# Altium PCB Karta_TETRA.PCBDOC (part 7 of 8)
Units mm, origin at the board's own origin, x right, y up, seen from the top; angles counter-clockwise.
Board outline 70 x 83.2 mm, 6 copper layers (TopLayer, Layer 1, Layer 2, Layer 3, Layer 4, Bottom Layer), stack 0.914 mm thick; 344 components, 222 nets, 1133 pads, 615 vias.
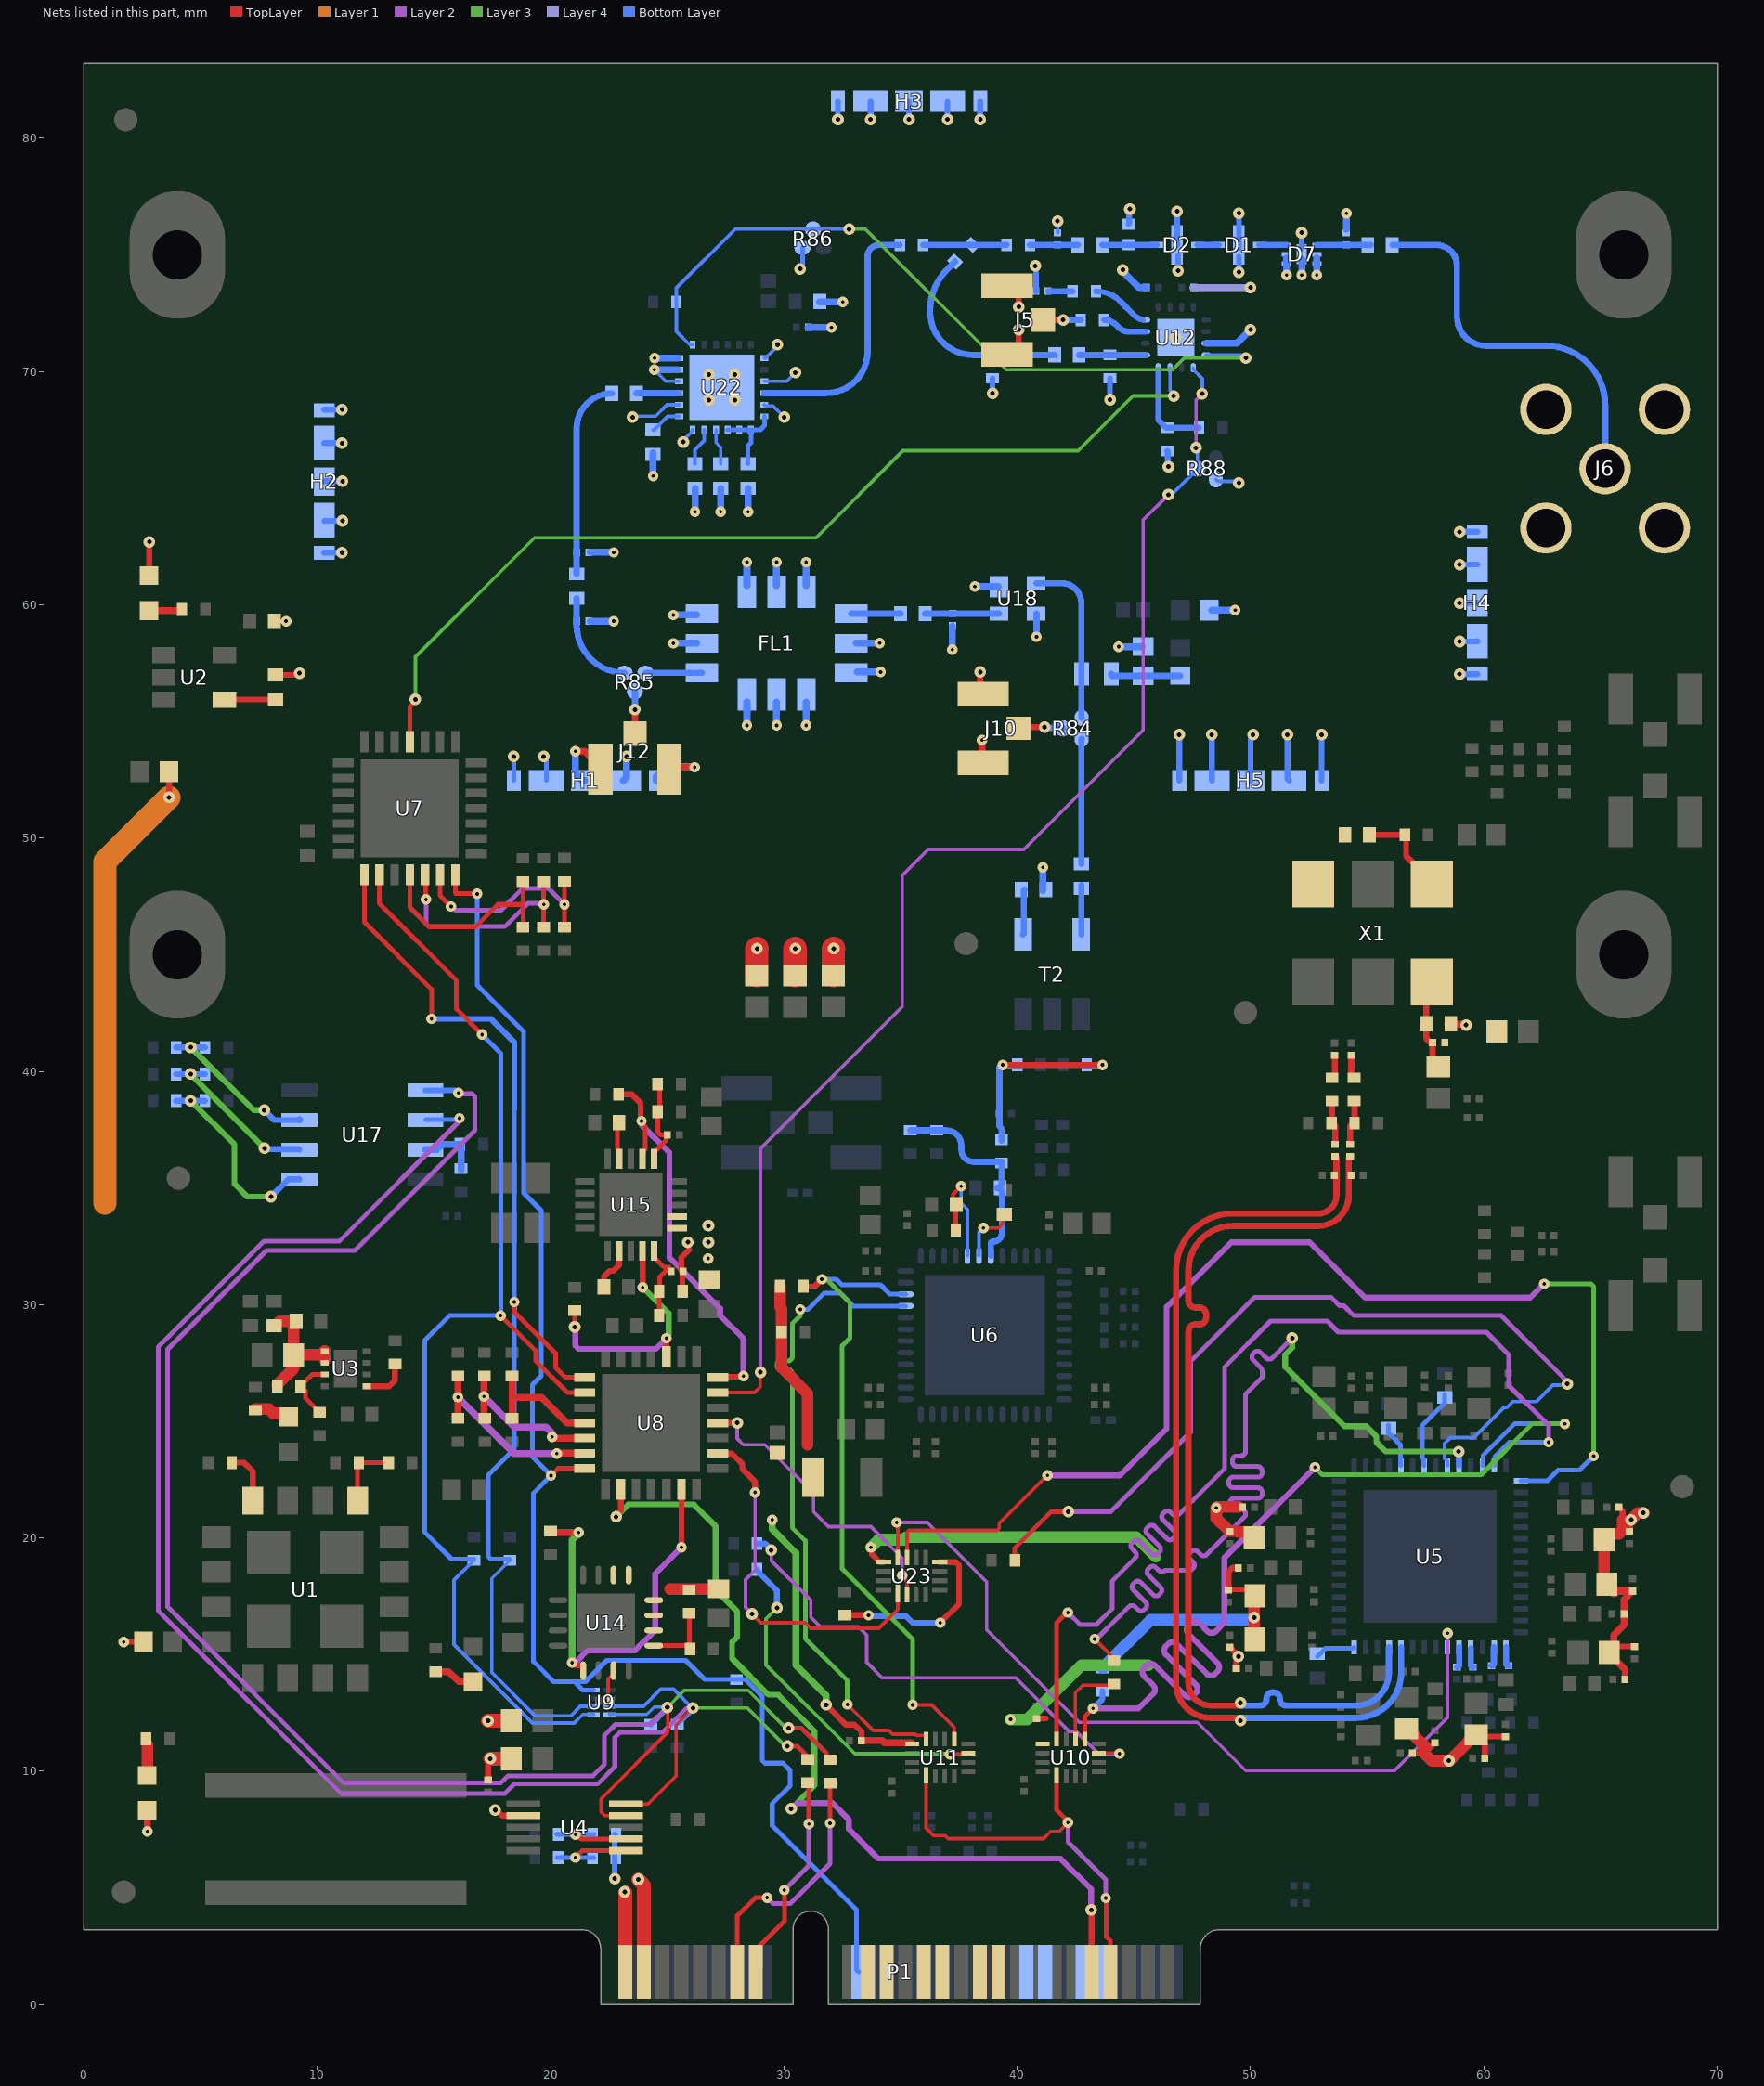
[diagram p8: the nets of this part, all layers, seen from the top]

## Via types
v1: diameter 0.5, hole 0.2, TopLayer to Bottom Layer, tented both sides, 402 vias
v2: diameter 0.45, hole 0.15, TopLayer to Bottom Layer, tented both sides, 189 vias
v3: diameter 0.45, hole 0.15, TopLayer to Bottom Layer, 23 vias
v4: diameter 0.5, hole 0.2, TopLayer to Bottom Layer, 1 vias

## Nets (pads, with @x,y where several pads share a name; then routed paths per layer and width w, separated by ;. In a path a pad name is that pad's centre, name@x,y a point inside that pad or via, vN(x,y) a via of type N, cw(c..) or ccw(c..) an arc to the next point about the centre after c; other vN are vias at no path point) (continued)
GND_ATT: C4.1 C5.1 C11.2 C12.1 C13.1 C48.1 C49.2 C158.1 C161.2 C162.2 C168.2 C180.1 C181.1 C182.2 C183.2 C184.2 C185.2 C186.1 C187.1 D1.2 D2.2 D7.2 D7.3 D7.4 D7.5 D7.7 D10.2 FB32.2 FB33.2 FB34.2 FL1.1 FL1.2 FL1.3 FL1.5 FL1.6 FL1.7 FL1.8 FL1.9 FL1.11 FL1.12 H1.1 H2.1 H3.1 H4.1 H5.1 J5.1 J5.3 J6.MH J10.1 J10.3 J12.1 J12.3 L1.1 R47.1 R48.2 R78.2 R86.2 R88.2 U12.11 U12.17 U18.2 U18.4 U22.1 U22.3 U22.5 U22.12 U22.14 U22.16 U22.17 U22.18 U22.25 | length 96.1
  TopLayer w0.2: C4.1@8.082,59.297 v2(8.662,59.297)
  TopLayer w0.25: D10.2@2.789,61.25 2.8,61.261 v1(2.8,62.7) ; C5.1@8.206,56.993 9.091,56.993 9.169,57.071 v1(9.237,57.071) ; J10.3@38.415,56.473 v1(38.415,57.117) ; J5.1@40.068,71.145 v1(40.068,71.788) ; v1(40.068,72.769) J5.3@40.068,73.412
  TopLayer w0.3: v2(21.059,53.722) 21.458,53.722 J12.3@22.144,53.037 ; J12.1@25.18,53.037 v2(26.178,53.037) ; J10.1@38.494,53.202 v2(38.494,54.2)
  TopLayer w1: FB34.2@28.836,44.095 28.836,45.248 v1(28.85,45.263) ; FB33.2@30.476,44.095 30.476,45.25 v1(30.488,45.263) ; FB32.2@32.114,44.102 32.114,45.239 v1(32.137,45.263)
  Layer 4 w0.3: 47.53,73.6 v1(50,73.6)
  Bottom Layer w0.15: v1(23.517,68.043) 23.562,68.088 24.506,68.088 24.993,68.574 U22.14@25.514,68.574 ; v2(24.443,70.074) 24.943,69.574 U22.16@25.514,69.574 ; v1(25.689,66.974) 25.689,67.049 26.089,67.449 U22.12@26.089,67.499 ; U22.5@29.164,68.574 29.214,68.524 29.535,68.524 v1(30.016,68.043) ; U22.3@29.164,69.574 30.115,69.574 v1(30.49,69.949) ; U22.1@29.164,70.574 29.214,70.574 29.719,71.08 v1(29.719,71.149) ; C187.1@41.733,75.946 v1(41.733,76.445) ; R88.2@48.516,65.381 48.604,65.293 49.432,65.293 v1(49.499,65.226)
  Bottom Layer w0.2: v1(18.421,53.5) 18.421,52.474 H1.1@18.423,52.472 ; v1(19.707,53.5) 19.707,53.419 19.823,53.302 H1.1@19.823,52.472 ; v1(30.7,74.4) 30.7,74.481 30.8,74.581 R86.2@30.8,75.3 ; C162.2@45.404,58.202 C162.2@45.409,58.208
  Bottom Layer w0.25: H2.1@10.299,62.23 10.301,62.233 11.058,62.233 v1(11.061,62.236) ; H2.1@10.299,66.924 10.301,66.927 11.058,66.927 v1(11.061,66.93) ; H2.1@10.299,68.364 10.301,68.367 11.058,68.367 v1(11.061,68.37) ; H2.1@10.313,63.593 10.316,63.596 11.073,63.596 v1(11.076,63.599) ; H2.1@10.313,65.293 10.316,65.296 11.073,65.296 v1(11.076,65.299) ; H3.1@32.309,81.57 32.312,81.567 32.312,80.81 v1(32.315,80.808) ; H3.1@33.709,81.57 33.712,81.567 33.712,80.81 v1(33.715,80.808) ; H3.1@35.359,81.57 35.362,81.567 35.362,80.81 v1(35.365,80.808) ; H3.1@37.009,81.57 37.012,81.567 37.012,80.81 v1(37.015,80.808) ; H3.1@38.409,81.57 38.412,81.567 38.412,80.81 v1(38.415,80.808) ; v1(38.943,69.063) R47.1@38.943,69.707 ; v1(40.775,74.525) cw(c40.697,74.447) 40.807,74.447 C13.1@40.807,73.44 ; v1(43.977,68.792) R48.2@43.977,69.707 ; L1.1@44.771,76.318 44.8,76.346 44.8,76.932 v1(44.829,76.961) ; R78.2@46.43,66.593 46.455,66.568 46.455,65.95 v1(46.481,65.925) ; D2.2@46.854,75.394 v1(46.854,76.866) ; v1(46.897,74.322) D2.2@46.897,74.965 ; v1(46.944,54.434) 46.947,54.431 46.947,52.474 H5.1@46.951,52.471 ; v1(48.339,54.434) 48.339,52.483 H5.1@48.351,52.471 ; v1(49.504,74.262) D1.2@49.504,74.905 ; D1.2@49.504,75.311 v1(49.504,76.783) ; H5.1@50,52.472 50.001,54.258 50.11,54.367 v1(50.11,54.434) ; v1(51.584,54.434) 51.584,52.538 H5.1@51.65,52.472 ; D7.7@52.193,75.303 v1(52.193,75.946) ; v1(53.048,54.434) 53.049,54.433 53.049,52.472 H5.1@53.05,52.472 ; v1(58.961,57.026) 58.964,57.029 59.721,57.029 H4.1@59.722,57.03 ; v1(58.961,58.426) 58.964,58.429 59.721,58.429 H4.1@59.724,58.432 ; v1(58.961,60.076) 58.964,60.079 59.721,60.079 H4.1@59.722,60.08 ; v1(58.961,61.726) 58.964,61.729 59.721,61.729 H4.1@59.724,61.732 ; v1(58.961,63.126) 58.964,63.129 59.721,63.129 H4.1@59.724,63.132
  Bottom Layer w0.268: v2(40.827,58.621) U18.4@40.827,59.619
  Bottom Layer w0.3: v2(21.059,53.722) 21.059,52.772 21.359,52.472 H1.1@21.473,52.472 ; C48.1@21.704,59.297 v2(22.702,59.297) ; C168.2@21.704,62.247 v2(22.702,62.247) ; H1.1@23.123,52.472 23.253,52.602 v1(23.253,53.5) ; v2(24.393,65.518) C182.2@24.393,66.516 ; v2(24.443,70.074) U22.17@25.441,70.074 ; v2(24.456,70.574) U22.18@25.454,70.574 ; H1.1@24.523,52.472 24.523,52.622 24.673,52.772 24.823,52.772 25.088,53.037 v2(26.178,53.037) ; v2(25.263,58.35) FL1.11@26.26,58.35 ; v2(25.263,59.563) FL1.12@26.26,59.563 ; v2(26.189,63.983) C183.2@26.189,64.981 ; v2(27.294,63.983) C184.2@27.294,64.981 ; v2(28.415,54.829) FL1.9@28.415,55.826 ; FL1.1@28.415,60.827 v2(28.415,61.825) ; v2(28.464,63.983) C185.2@28.464,64.981 ; v2(29.685,54.829) FL1.8@29.685,55.826 ; FL1.2@29.685,60.827 v2(29.685,61.825) ; v2(30.955,54.829) FL1.7@30.955,55.826 ; FL1.3@30.955,60.827 v2(30.955,61.825) ; C180.1@31.036,71.887 v2(32.034,71.887) ; C181.1@31.522,72.981 v2(32.52,72.981) ; FL1.5@33.111,58.352 v2(34.109,58.352) ; FL1.6@33.146,57.117 v2(34.143,57.117) ; v2(37.221,58.079) C49.2@37.221,59.077 ; v2(38.181,60.782) U18.2@39.179,60.782 ; C158.1@41.097,47.745 v2(41.097,48.743) ; v2(44.348,58.202) C162.2@45.346,58.202 ; v1(44.524,74.36) 44.562,74.322 44.562,74.262 45.224,73.6 C12.1@45.527,73.6 ; C11.2@47.567,73.6 v1(50,73.6) ; U12.11@48.097,71.207 49.419,71.207 v1(50,71.788) ; C161.2@48.345,59.768 v2(49.343,59.768) ; v2(51.543,74.131) D7.4@51.543,74.626 51.543,74.878 ; v2(52.193,74.131) D7.7@52.193,74.817 ; v2(52.843,74.131) D7.3@52.843,74.626 52.843,74.878 ; 54.108,76.097 v2(54.108,76.783)
  other v1: 26.789,68.774 27.889,68.774 26.789,69.874 27.889,69.874 46.797,71.457
GND_VCXO: C42.1 C111.1 C112.1 FB15.1 X1.3 | length 0.8
  TopLayer w0.3: C112.1@58.453,42.044 58.483,42.014 59.214,42.014 v1(59.244,41.984)
I2C_SCL: R66.1 R71.2 U4.5 U9.3 U17.6 | length 75.3
  TopLayer w0.15: U4.5@23.227,8.594 24.173,8.594 25.379,9.8 25.379,11.99 v1(26.099,12.711)
  TopLayer w0.2: v1(30.156,11.077) 30.568,11.077 31.025,10.62 R71.2@31.025,10.454
  Layer 2 w0.2: v2(16.101,37.991) 16.101,37.871 10.953,32.724 7.725,32.724 3.181,28.18 3.181,16.885 11.017,9.049 18.041,9.049 18.447,9.456 22.017,9.456 22.754,10.193 22.754,11.446 22.968,11.66 24.79,11.66 25.842,12.711 v1(26.099,12.711)
  Layer 3 w0.15: v1(26.099,12.711) 28.429,12.711 30.064,11.077 v1(30.156,11.077)
  Bottom Layer w0.15: U9.3@22.514,12.781 23.988,12.781 24.72,13.514 25.265,13.514 26.069,12.711 v1(26.099,12.711)
  Bottom Layer w0.2: U17.6@14.654,37.931 16.101,37.931 v2(16.101,37.991) ; R66.1@25.429,12.019 25.629,12.219 25.679,12.219 26.069,12.609 v1@26.069,12.711
I2C_SDA: R65.1 R70.2 U4.4 U9.4 U17.5 | length 77.5
  TopLayer w0.15: U4.4@23.227,8.094 22.327,8.094 22.167,8.254 22.167,8.815 25.019,11.666 25.019,12.719 v1(25.003,12.735)
  TopLayer w0.2: v1(30.2,11.851) 30.753,11.851 31.807,10.797 31.807,10.616 R70.2@31.982,10.441
  Layer 2 w0.2: v2(16.054,39.074) 16.092,39.036 16.643,39.036 16.76,38.919 16.76,37.474 11.61,32.324 7.82,32.324 3.581,28.085 3.581,17.05 11.141,9.491 17.861,9.491 18.175,9.806 21.823,9.806 22.313,10.295 22.313,11.539 22.783,12.01 24.256,12.01 24.982,12.735 v1(25.003,12.735)
  Layer 3 w0.15: v1(25.003,12.735) 25.734,13.466 28.466,13.466 30.081,11.851 v1(30.2,11.851)
  Bottom Layer w0.15: U9.4@22.514,12.431 24.126,12.431 24.445,12.751 v1@25.019,12.751
  Bottom Layer w0.2: R65.1@24.3,11.969 25.003,12.673 v1(25.003,12.735)
  Bottom Layer w0.25: U17.5@14.637,39.184 15.89,39.184 15.999,39.074 v2(16.054,39.074)
LMK_CLKin0_N: C46.1 U5.33 | length 0.9
  Bottom Layer w0.267: C46.1@58.847,14.465 ccw(c58.847,14.56) 58.943,14.56 U5.33@58.943,15.306
LMK_CLKin0_P: C47.1 U5.32 | length 0.8
  Bottom Layer w0.267: U5.32@59.443,15.247 59.443,14.56 ccw(c59.538,14.56) C47.1@59.538,14.465
LMK_CLKin1_N: C59.1 U5.30 | length 0.8
  Bottom Layer w0.268: C59.1@60.323,14.519 ccw(c60.323,14.625) 60.429,14.625 U5.30@60.429,15.306
LMK_CLKin1_P: C54.1 U5.29 | length 0.8
  Bottom Layer w0.268: U5.29@60.957,15.306 60.957,14.625 ccw(c61.063,14.625) C54.1@61.063,14.519
LMK_CLKsel: U5.34 U23.12 | length 35.9
  TopLayer w0.15: v2(34.831,20.66) 34.877,20.615 U23.12@34.877,19.164
  Layer 2 w0.15: v2(34.831,20.66) 36.144,20.66 38.693,18.111 38.693,16.069 42.663,12.099 47.725,12.099 49.796,10.028 56.173,10.028 58.448,12.303 v2(58.448,15.913)
  Bottom Layer w0.15: U5.34@58.443,15.306 58.429,15.32 58.429,15.893 v2(58.448,15.913)
LMK_CLKsel_3V3: U8.23 U23.1 | length 15.7
  TopLayer w0.15: v1(28.635,16.742) 29.018,16.359 30.913,16.359 31.149,16.122 34.067,16.122 34.877,16.932 U23.1@34.877,17.614
  TopLayer w0.25: U8.23@27.16,23.629 27.169,23.621 27.777,23.621 28.217,23.18 28.217,22.961 28.765,22.413 v2(28.765,21.95)
  Layer 2 w0.15: v1(28.635,16.742) 28.355,17.022 28.355,18.21 28.765,18.62 v2(28.765,21.95)
LMK_OSC_IN_N: C39.1 C41.1 U5.38 | length 40.9
  TopLayer w0.268: v1(49.57,12.172) ccw(c49.454,12.172) 49.454,12.288 48.296,12.288 cw(c48.296,13.772) 46.812,13.772 46.812,31.482 cw(c49.232,31.482) 49.232,33.902 52.897,33.902 ccw(c52.897,34.693) 53.688,34.693 53.688,36.298 ccw(c53.632,36.298) C41.1@53.632,36.353
  Bottom Layer w0.268: v1(49.57,12.172) cw(c49.686,12.172) 49.686,12.288 54.517,12.288 ccw(c54.517,14.232) 56.461,14.232 U5.38@56.461,15.306
LMK_OSC_IN_P: C44.1 C45.2 U5.39 | length 41
  TopLayer w0.268: v1(49.57,12.932) cw(c49.454,12.932) 49.454,12.816 48.296,12.816 cw(c48.296,13.772) 47.34,13.772 47.34,28.004 47.34,28.863 cw(c47.63,28.863) 47.63,29.153 47.808,29.153 ccw(c47.808,29.443) 48.098,29.443 48.098,29.588 ccw(c47.808,29.588) 47.808,29.878 47.63,29.878 cw(c47.63,30.168) 47.34,30.168 47.34,31.482 cw(c49.232,31.482) 49.232,33.374 52.897,33.374 ccw(c52.897,34.693) 54.216,34.693 54.216,36.298 cw(c54.271,36.298) C44.1@54.271,36.353
  Bottom Layer w0.268: v1(49.57,12.932) ccw(c49.686,12.932) 49.686,12.816 50.28,12.816 50.414,12.816 ccw(c50.414,13.084) 50.682,13.084 50.682,13.119 cw(c50.94,13.119) 50.94,13.377 50.997,13.377 cw(c50.997,13.119) 51.255,13.119 51.255,13.084 ccw(c51.523,13.084) 51.523,12.816 52.216,12.816 54.517,12.816 ccw(c54.517,14.232) 55.933,14.232 U5.39@55.933,15.306
NetC5_2: C5.2 U2.4 | length 2.2
  TopLayer w0.25: U2.4@6.019,55.931 6.025,55.937 8.197,55.937 8.203,55.943 C5.2@8.206,55.943
NetC7_2: C7.2 C8.2 FB1.1 R6.2 U3.1 U3.2 | length 5.9
  TopLayer w0.5: C8.2@8.151,29.095 8.201,29.095 8.388,29.282 C7.2@9.101,29.282 9.101,29.232 8.986,29.117 FB1.1@8.986,27.846 ; R6.2@8.286,26.507 8.286,26.572 8.986,27.272 FB1.1@8.986,27.846 ; 10.316,27.632 U3.1@10.316,28.007 10.155,27.846 FB1.1@8.986,27.846
NetC10_1: C10.1 R48.1 U12.1 | length 2.8
  Bottom Layer w0.268: C10.1@42.652,70.707 R48.1@43.977,70.707 U12.1@45.497,70.707
NetC10_2: C10.2 R46.2 R47.2 | length 8.9
  Bottom Layer w0.268: R46.2@37.343,74.719 37.009,74.386 ccw(c38.805,72.59) 36.265,72.59 36.265,72.557 ccw(c38.115,72.557) 38.115,70.707 R47.2@38.943,70.707 C10.2@41.602,70.707
NetC13_2: C13.2 R80.1 | length 1.1
  Bottom Layer w0.25: C13.2@41.327,73.44 R80.1@42.377,73.44
NetC35_2: C35.2 U5.42 | length 1.8
  Bottom Layer w0.2: C35.2@52.861,14.909 52.861,14.914 53.212,15.265 54.423,15.265 54.443,15.285 U5.42@54.443,15.306
NetC36_2: C36.2 U5.7 | length 3.5
  Bottom Layer w0.2: U5.7@57.443,23.106 57.423,23.126 57.423,23.375 57.374,23.423 57.374,24.843 58.326,25.794 C36.2@58.326,26.157
NetC37_2: C37.2 U5.5 | length 2
  Bottom Layer w0.2: C37.2@55.918,24.842 55.918,24.5 56.433,23.985 56.433,23.116 U5.5@56.443,23.106
NetC40_1: C40.1 R21.1 | length 1
  TopLayer w0.268: R21.1@53.493,39.725 ccw(c53.493,39.843) 53.61,39.843 C40.1@53.61,40.695
NetC41_2: C41.2 R19.1 R21.2 | length 2
  TopLayer w0.268: R21.2@53.493,38.725 53.493,37.804 cw(c53.472,37.804) R19.1@53.472,37.783 cw(c53.472,37.623) 53.632,37.623 C41.2@53.632,36.873
NetC42_2: C42.2 R20.2 X1.1 | length 4.3
  TopLayer w0.25: C42.2@54.964,50.14 56.669,50.14 56.669,49.234 57.773,48.129 X1.1@57.773,48.029
NetC43_1: C43.1 R22.1 | length 1
  TopLayer w0.268: C43.1@54.323,40.695 54.323,39.845 ccw(c54.443,39.845) R22.1@54.443,39.725
NetC44_2: C44.2 R22.2 R23.2 | length 2
  TopLayer w0.268: C44.2@54.271,36.873 54.271,37.592 cw(c54.463,37.592) R23.2@54.463,37.783 54.463,38.705 ccw(c54.443,38.705) R22.2@54.443,38.725
NetC48_2: C48.2 C167.2 R85.1 | length 4.4
  Bottom Layer w0.268: C167.2@21.117,60.272 C48.2@21.117,59.297 21.117,59.132 ccw(c23.167,59.132) R85.1@23.167,57.082
NetC49_1: C49.1 C163.2 U18.1 | length 3.2
  Bottom Layer w0.268: C163.2@36.05,59.622 C49.1@37.221,59.622 U18.1@39.218,59.622
NetC65_2: C65.2 R1.2 R5.2 R54.2 U6.7 | length 9.3
  Bottom Layer w0.268: R1.2@35.417,37.478 R5.2@36.547,37.478 36.951,37.478 cw(c36.951,36.817) 37.611,36.817 37.611,36.644 ccw(c38.133,36.644) 38.133,36.122 39.329,36.122 39.329,35.2 cw(c39.133,35.2) C65.2@39.133,35.004
  Bottom Layer w0.269: U6.7@38.867,32.092 38.867,32.608 cw(c38.956,32.608) 38.956,32.696 ccw(c38.956,33.096) 39.355,33.096 39.355,34.782 ccw(c39.133,34.782) C65.2@39.133,35.004
NetC66_2: C66.2 R52.1 R54.1 R55.2 | length 9.1
  TopLayer w0.269: v2(39.381,40.275) v2(43.658,40.275)
  Bottom Layer w0.268: R54.1@39.329,37.022 39.329,37.56 39.237,37.652 C66.2@39.237,38.196 39.237,40.13 cw(c39.381,40.13) v2(39.381,40.275)
  Bottom Layer w0.269: v2(39.381,40.275) R55.2@40.056,40.275 ; R52.1@42.93,40.275 v2(43.658,40.275)
NetC73_2: C73.2 R96.2 U6.5 | length 5
  TopLayer w0.15: C73.2@37.253,34.288 37.253,34.728 v2(37.598,35.074)
  TopLayer w0.2: R96.2@37.317,33.186 ccw(c37.317,33.228) 37.359,33.228 C73.2@37.359,34.156
  Bottom Layer w0.15: v2(37.598,35.074) 37.598,34.349 37.867,34.079 U6.5@37.867,32.092
NetC74_2: C74.2 U6.6 | length 2.8
  TopLayer w0.15: v2(38.552,33.29) 39.22,33.29 39.381,33.451 39.381,33.938 C74.2@39.449,34.005
  Bottom Layer w0.15: U6.6@38.339,32.121 U6.6@38.367,32.092 38.367,33.093 38.552,33.277 v2(38.552,33.29)
NetC92_1: C92.1 U14.7 | length 1.4
  TopLayer w0.15: C92.1@22.583,13.023 22.469,13.137 22.469,13.948 22.698,14.177 U14.7@22.698,14.309
NetC111_2: C111.2 C112.2 FB12.2 X1.6 | length 4.1
  TopLayer w0.268: X1.6@57.773,43.829 ccw(c57.773,43.594) 57.538,43.594 C112.2@57.538,42.044 57.538,41.504 ccw(c57.803,41.504) C111.2@57.803,41.239 57.803,40.437 ccw(c58.054,40.437) FB12.2@58.054,40.186
NetC130_1: C130.1 R100.1 R101.2 U15.16 | length 3.6
  TopLayer w0.2: U15.16@24.445,36.539 24.956,37.049 24.956,37.229 C130.1@25.005,37.279 24.716,37.279 24.588,37.406 R100.1@24.588,38.268 24.673,38.353 24.673,39.371 R101.2@24.588,39.456
NetC142_1: C142.1 R102.1 R103.1 U15.10 | length 3.1
  TopLayer w0.2: U15.10@24.445,32.019 24.485,31.979 24.868,31.596 25.086,31.596 25.086,31.586 24.673,31.173 R102.1@24.673,30.547 ; R103.1@24.654,29.531 R102.1@24.654,30.567
NetC151_2: C151.2 U15.7 | length 1.9
  TopLayer w0.25: C151.2@22.291,30.764 22.291,31.205 22.533,31.448 22.698,31.448 22.945,31.695 U15.7@22.945,32.304
NetC152_2: C152.2 U15.19 | length 1.5
  TopLayer w0.2: C152.2@22.86,37.705 22.86,36.688 22.905,36.643 22.905,36.294 U15.19@22.945,36.254
NetC158_2: C158.2 T2.5 | length 1.9
  Bottom Layer w0.268: T2.5@40.248,45.873 40.281,45.906 40.281,47.755 C158.2@40.314,47.788
NetC159_1: C159.1 J6.1 | length 16.7
  Bottom Layer w0.268: C159.1@56.077,75.426 57.95,75.426 cw(c57.95,74.526) 58.85,74.526 58.85,72.35 ccw(c60.1,72.35) 60.1,71.1 62.66,71.1 cw(c62.66,68.56) 65.2,68.56 J6.1@65.2,65.831
NetC159_2: C159.2 C186.2 D7.1 | length 2.3
  Bottom Layer w0.268: D7.1@52.843,75.426 C159.2@55.027,75.426 C159.2@55.162,75.426
NetC160_1: C160.1 D2.1 L1.2 | length 2.3
  Bottom Layer w0.268: C160.1@43.648,75.426 D2.1@45.979,75.426
NetC160_2: C160.2 C187.2 R18.1 | length 2
  Bottom Layer w0.268: R18.1@40.55,75.426 C187.2@41.733,75.426 C160.2@42.598,75.426
NetC162_1: C162.1 L6.2 R119.1 | length 3
  Bottom Layer w0.279: L6.2@44.036,57.03 ccw(c44.113,57.03) 44.113,56.952 C162.1@45.404,56.952 R119.1@46.983,56.952
NetC163_1: C163.1 FL1.4 | length 2.1
  Bottom Layer w0.268: FL1.4@32.885,59.622 C163.1@35,59.622
NetC164_1: C164.1 R84.2 | length 5.4
  Bottom Layer w0.268: C164.1@42.748,48.89 42.748,54.25 R84.2@42.761,54.25
NetC164_2: C164.2 T2.4 | length 2.1
  Bottom Layer w0.268: T2.4@42.748,45.873 C164.2@42.748,47.975
NetC167_1: C167.1 C168.1 C169.2 | length 8.6
  Bottom Layer w0.268: C167.1@21.117,61.322 C168.1@21.117,62.247 21.117,67.552 cw(c22.628,67.552) C169.2@22.628,69.063
NetC169_1: C169.1 U22.15 | length 1.8
  Bottom Layer w0.268: C169.1@23.678,69.063 23.684,69.069 25.508,69.069 U22.15@25.514,69.074
NetC182_1: C182.1 U22.13 | length 1.4
  Bottom Layer w0.15: C182.1@24.393,67.499 24.443,67.499 25.018,68.074 U22.13@25.514,68.074
NetC183_1: C183.1 U22.11 | length 1.6
  Bottom Layer w0.15: C183.1@26.189,66.043 26.189,66.646 26.589,67.046 U22.11@26.589,67.499
NetC184_1: C184.1 U22.10 | length 1.5
  Bottom Layer w0.15: U22.10@27.089,67.499 27.089,66.949 27.294,66.743 C184.1@27.294,66.043
NetC185_1: C185.1 U22.6 U22.7 U22.8 U22.9 | length 3.6
  Bottom Layer w0.2: U22.9@27.589,67.499 U22.8@28.089,67.499 U22.7@28.589,67.499 ; C185.1@28.464,66.043 28.464,66.818 28.589,66.943 U22.7@28.589,67.499 ; U22.6@29.164,68.074 29.164,67.674 28.989,67.499 U22.7@28.589,67.499
NetD1_1: D1.1 D2.3 | length 0.9
  Bottom Layer w0.268: D2.3@47.729,75.426 D1.1@48.629,75.426
NetD1_3: D1.3 D7.6 | length 1.2
  Bottom Layer w0.268: D1.3@50.379,75.426 D7.6@51.543,75.426
NetD9_1: D9.1 R120.1 | length 1.8
  TopLayer w0.3: R120.1@15.074,14.268 15.64,14.268 16.064,13.844 D9.1@16.674,13.844
NetD10_1: D10.1 R122.1 | length 1.5
  TopLayer w0.3: D10.1@2.789,59.75 R122.1@4.266,59.75
NetD11_1: D11.1 R121.1 | length 1.3
  TopLayer w0.5: D11.1@2.715,9.825 R121.1@2.715,11.146
NetD12_1: D12.1 R124.1 | length 1.6
  TopLayer w0.5: R124.1@7.339,25.525 7.929,25.525 8.115,25.339 8.626,25.339 D12.1@8.776,25.189
NetFL1_10: FL1.10 R85.2 | length 2.4
  Bottom Layer w0.268: R85.2@24.067,57.082 FL1.10@26.485,57.082
NetJ5_2: J5.2 R50.1 | length 1.6
  TopLayer w0.268: J5.2@41.097,72.207 v1(41.973,72.207)
  Bottom Layer w0.268: v1(41.973,72.207) R50.1@42.723,72.207
NetJ10_2: J10.2 R84.3 | length 1.9
  TopLayer w0.268: J10.2@40.068,54.7 40.122,54.754 v1@41.129,54.754
  Bottom Layer w0.268: v1(41.173,54.754) 41.2,54.727 41.946,54.727 R84.3@41.973,54.7
NetJ12_2: J12.2 R85.3 | length 1.8
  TopLayer w0.268: J12.2@23.617,54.481 v1(23.617,55.508)
  Bottom Layer w0.268: v1(23.617,55.508) R85.3@23.617,56.295
NetL6_1: L6.1 R84.1 U18.3 | length 7.4
  Bottom Layer w0.268: U18.3@40.818,60.922 41.906,60.922 cw(c41.906,60.08) 42.748,60.08 42.748,55.15 R84.1@42.761,55.15
NetR2_1: R2.1 R4.2 U1.13 | length 3
  TopLayer w0.2: U1.13@11.735,21.594 11.728,21.601 11.728,23.229 R2.1@13.112,23.229
NetR3_1: R3.1 U1.16 | length 2.3
  TopLayer w0.25: R3.1@6.328,23.229 6.86,23.229 7.235,22.854 U1.16@7.235,21.594
NetR6_1: R6.1 R7.2 U3.3 | length 2.8
  TopLayer w0.2: R6.1@9.236,26.507 R6.1@9.286,26.507 ; R7.2@10.102,25.339 R7.2@10.102,25.389 9.486,26.005 9.486,26.307 R6.1@9.286,26.507 ; U3.3@10.316,27.007 9.786,27.007 R6.1@9.286,26.507
NetR9_1: R9.1 U5.9 | length 39.3
  TopLayer w0.2: R9.1@39.901,19.043 39.901,19.573 41.453,21.125 v1(42.191,21.125)
  Layer 2 w0.2: v1(42.191,21.125) 44.015,21.125 47.435,24.545 47.435,27.576 50.161,30.302 53.472,30.302 53.821,29.953 54.006,29.953 54.432,29.527 60.75,29.527 63.438,26.839 63.438,26.825 63.579,26.684 v1(63.579,26.602)
  Bottom Layer w0.15: U5.9@58.443,23.106 58.443,23.286 58.323,23.406 58.323,24.054 58.575,24.306 59.352,24.306 59.361,24.297 59.572,24.297 60.873,25.597 60.998,25.597 61.245,25.844 62.255,25.844 62.958,26.547 63.511,26.547 63.567,26.602 v1(63.579,26.602)
NetR13_1: R13.1 U11.7 | length 14.9
  TopLayer w0.15: v2(37.125,10.725) 37.129,10.729 37.85,10.729 U11.7@37.9,10.779
  Layer 3 w0.15: v1(29.7,17) 29.234,16.534 29.234,14.559 33.039,10.754 37.097,10.754 v2(37.125,10.725)
  Bottom Layer w0.25: R13.1@28.846,18.655 28.846,18.605 29.7,17.751 v1(29.7,17)
NetR16_1: R16.1 U5.10 | length 40.9
  TopLayer w0.15: v3(43.317,15.67) 44.196,14.79 R16.1@44.096,14.69
  Layer 2 w0.2: v3(43.317,15.67) 43.401,15.67 44.384,16.653 44.776,17.045 cw(c44.918,16.903) 45.059,17.045 45.184,16.92 ccw(c45.312,17.049) 45.44,16.92 45.505,16.984 ccw(c45.376,17.113) 45.505,17.241 44.973,17.773 cw(c45.101,17.901) 44.973,18.03 45.037,18.094 cw(c45.165,17.966) 45.294,18.094 45.826,17.562 ccw(c45.954,17.691) 46.082,17.562 46.147,17.626 ccw(c46.018,17.755) 46.147,17.883 45.615,18.415 cw(c45.743,18.543) 45.615,18.672 45.679,18.736 cw(c45.807,18.608) 45.936,18.736 46.06,18.612 ccw(c46.202,18.753) 46.343,18.612 46.351,18.62 47.004,18.62 47.459,18.62 47.53,18.69 ccw(c47.388,18.832) 47.53,18.973 47.405,19.098 cw(c47.534,19.226) 47.405,19.354 47.47,19.419 cw(c47.598,19.29) 47.726,19.419 47.851,19.294 ccw(c47.992,19.436) 48.134,19.294 48.565,19.726 49.784,20.944 49.784,21.044 ccw(c49.584,21.044) 49.584,21.244 49.298,21.244 cw(c49.298,21.426) 49.117,21.426 49.117,21.517 cw(c49.298,21.517) 49.298,21.698 50.312,21.698 ccw(c50.312,21.88) 50.494,21.88 50.494,21.971 ccw(c50.312,21.971) 50.312,22.152 49.256,22.152 cw(c49.256,22.334) 49.074,22.334 49.074,22.425 cw(c49.256,22.425) 49.256,22.606 50.312,22.606 ccw(c50.312,22.788) 50.494,22.788 50.494,22.879 ccw(c50.312,22.879) 50.312,23.06 49.412,23.06 cw(c49.412,23.242) 49.23,23.242 49.23,23.333 cw(c49.412,23.333) 49.412,23.514 49.584,23.514 ccw(c49.584,23.714) 49.784,23.714 49.784,24.142 49.784,26.162 49.827,26.205 50.495,26.873 50.495,27.162 ccw(c50.295,27.162) 50.437,27.304 50.107,27.633 cw(c50.236,27.762) 50.107,27.89 50.171,27.954 cw(c50.3,27.826) 50.428,27.954 50.66,27.722 ccw(c50.802,27.863) 50.943,27.722 51.514,28.293 v1(51.787,28.565)
  Layer 3 w0.25: v1(51.787,28.565) 51.787,28.151 51.491,27.855 51.491,27.329 54.03,24.79 54.962,24.79 55.395,24.358 55.395,24.103 55.796,23.702 v1(58.919,23.702)
  Bottom Layer w0.25: v1(58.919,23.702) 58.938,23.683 58.938,23.111 U5.10@58.943,23.106
NetR18_2: R18.2 R45.1 R46.1 | length 3.6
  Bottom Layer w0.268: R45.1@35.965,75.426 R46.1@38.05,75.426 R18.2@39.55,75.426
NetR45_2: R45.2 U22.4 | length 11.2
  Bottom Layer w0.268: U22.4@29.164,69.074 31.815,69.074 ccw(c31.815,70.845) 33.585,70.845 33.585,74.926 cw(c34.085,74.926) 34.085,75.426 R45.2@34.965,75.426
NetR49_1: R49.1 R78.1 U12.16 | length 4
  Bottom Layer w0.25: U12.16@46.045,70.082 46.045,67.928 46.28,67.693 46.38,67.593 R49.1@47.797,67.593
NetR50_2: R50.2 U12.3 | length 1.9
  Bottom Layer w0.268: R50.2@43.723,72.207 cw(c43.723,71.47) 44.244,71.991 44.348,71.887 ccw(c44.783,72.322) 44.783,71.707 U12.3@45.497,71.707
NetR57_2: R57.2 R60.2 U7.11 | length 9.1
  TopLayer w0.2: U7.11@13.967,48.427 13.967,47.021 14.808,46.18 16.766,46.18 17.741,47.154 18.818,47.154 ; R57.2@18.818,46.127 18.818,47.154 ; R60.2@18.818,48.182 18.818,47.154
NetR58_2: R58.2 R61.2 U7.12 | length 9.7
  TopLayer w0.2: U7.12@14.617,48.427 14.638,48.406 14.638,47.389 v2(14.659,47.368) ; R58.2@19.707,46.127 v2(19.707,47.154) R61.2@19.707,48.182
  Layer 2 w0.2: v2(14.659,47.368) 14.659,46.317 14.776,46.2 18.036,46.2 19.031,47.195 19.525,47.195 19.527,47.193 19.668,47.193 v2(19.707,47.154)
NetR59_2: R59.2 R62.2 U7.13 | length 9.2
  TopLayer w0.2: U7.13@15.267,48.427 15.267,47.536 v2(15.737,47.066) ; R59.2@20.596,46.127 v2(20.596,47.153) R62.2@20.596,48.189
  Layer 2 w0.2: v2(15.737,47.066) 15.757,47.066 15.917,46.906 17.87,46.906 18.795,47.832 19.917,47.832 v2(20.596,47.153)
NetR63_1: R63.1 R77.1 U17.1 | length 8.9
  Layer 3 w0.25: v1(4.572,38.743) 6.452,36.864 6.452,35.179 7.002,34.629 v1(8.017,34.629)
  Bottom Layer w0.25: R77.1@3.954,38.743 v1(4.572,38.743) R63.1@5.19,38.743 ; v1(8.017,34.629) 8.762,35.374 U17.1@9.237,35.374
NetR67_2: R67.2 R72.2 U8.11 | length 5.5
  TopLayer w0.3: R72.2@18.351,25.073 18.351,26.033 ; R67.2@18.351,26.992 18.351,26.033 ; U8.11@21.46,24.929 20.713,24.929 19.61,26.033 18.351,26.033
NetR68_2: R68.2 R73.2 U8.12 | length 7.1
  TopLayer w0.3: R68.2@17.162,26.992 17.174,26.98 17.145,26.95 v2(17.145,26.06) 17.145,25.115 R73.2@17.187,25.073 ; v2(20.066,24.333) 20.107,24.333 20.16,24.279 U8.12@21.46,24.279
  Layer 2 w0.3: v2(17.145,26.06) 18.447,24.758 19.612,24.758 19.815,24.758 20.037,24.536 20.037,24.362 v2(20.066,24.333)
NetR69_2: R69.2 R74.2 U8.13 | length 8.4
  TopLayer w0.3: R74.2@16.032,25.073 v2(16.032,26.033) R69.2@16.032,26.992 ; v2(20.267,23.621) 20.276,23.629 U8.13@21.46,23.629
  Layer 2 w0.3: v2(16.032,26.033) 18.444,23.621 v2(20.267,23.621)
NetR75_2: R75.2 U23.8 | length 7.9
  TopLayer w0.25: R75.2@32.61,16.689 33.568,16.689 33.575,16.682 v2(33.628,16.682) ; U23.8@36.677,18.964 37.365,18.964 37.512,18.818 37.512,17.178 v2(36.7,16.366)
  Bottom Layer w0.25: v2(33.628,16.682) 33.656,16.654 35.227,16.654 35.516,16.366 v2(36.7,16.366)
NetR76_1: R76.1 R79.2 U17.2 | length 7.3
  Layer 3 w0.25: v1(4.572,39.886) 4.572,39.878 7.739,36.712 v1(7.739,36.703)
  Bottom Layer w0.25: R79.2@3.954,39.886 v1(4.572,39.886) R76.1@5.19,39.886 ; v1(7.739,36.703) 7.768,36.673 9.207,36.673 U17.2@9.237,36.644
NetR80_2: R80.2 U12.4 | length 2.4
  Bottom Layer w0.25: R80.2@43.377,73.44 cw(c43.377,71.975) 44.413,73.011 45.02,72.405 ccw(c45.497,72.882) U12.4@45.387,72.216
NetR87_1: R87.1 U10.7 | length 21.6
  TopLayer w0.15: U10.7@43.495,10.779 43.503,10.787 44.351,10.787 v2(44.384,10.754)
  Layer 2 w0.15: v1(29.456,19.475) 29.456,19.028 31.151,17.333 31.151,16.602 31.559,16.194 33.185,16.194 33.544,15.835 33.544,14.674 34.208,14.01 39.93,14.01 42.226,11.713 42.527,11.713 43.486,10.754 v2(44.384,10.754)
  Bottom Layer w0.25: R87.1@28.846,19.755 29.194,19.755 29.456,19.493 v1(29.456,19.475)
NetR98_1: R98.1 R99.2 U14.9 | length 3.1
  TopLayer w0.2: U14.9@24.423,15.384 R99.2@25.883,15.384 ; R98.1@25.942,16.826 25.942,15.325 R99.2@26.025,15.242
NetR108_1: R108.1 R110.2 U4.2 | length 3.8
  TopLayer w0.2: v2(21.064,7.285) 21.118,7.285 21.309,7.094 U4.2@23.227,7.094
  Bottom Layer w0.2: R110.2@20.275,7.285 v2(21.064,7.285) R108.1@21.853,7.285
NetR109_1: R109.1 R111.2 U4.1 | length 3.9
  TopLayer w0.2: v2(21.062,6.294) 21.362,6.594 U4.1@23.227,6.594
  Bottom Layer w0.2: R111.2@20.28,6.294 v2(21.062,6.294) R109.1@21.844,6.294
NetR112_1: R112.1 R115.2 U17.7 | length 2.7
  Bottom Layer w0.3: U17.7@14.637,36.644 15.112,36.644 15.34,36.872 16.161,36.872 R112.1@16.161,35.78
NetR113_1: R113.1 R114.2 U17.3 | length 7.2
  Layer 3 w0.25: v1(4.579,41.029) 7.274,38.335 v1(7.729,38.335)
  Bottom Layer w0.25: R114.2@3.954,41.029 v1(4.579,41.029) R113.1@5.19,41.029 ; v1(7.729,38.335) 8.15,37.914 U17.3@9.237,37.914
  Bottom Layer w0.3: U17.3@9.228,37.922 U17.3@9.237,37.914
NetR123_2: R123.2 U3.5 | length 2
  TopLayer w0.25: U3.5@12.116,26.507 13.081,26.507 13.326,26.752 R123.2@13.326,27.452
PER0_N: P1.21
PER0_P: P1.19
PER1_N: P1.27
PER1_P: P1.25
PER2_N: P1.33
PER2_P: P1.31
PERST2#: P1.43 U8.16 | length 39.1
  TopLayer w0.25: v1(22.809,20.906) 22.809,20.974 23.01,21.175 U8.16@23.01,22.079 ; v1(43.17,4.054) 43.185,4.039 43.185,1.415 P1.43@43.2,1.4
  Layer 2 w0.25: v1(30.311,8.39) 30.34,8.39 30.583,8.632 32.08,8.632 32.785,7.928 32.785,7.515 34.046,6.254 41.863,6.254 43.17,4.946 v1(43.17,4.054)
  Layer 3 w0.25: v1(22.809,20.906) 23.337,21.434 26.144,21.434 27.075,20.502 27.075,17.766 28,16.841 28,15.761 27.777,15.538 27.777,14.833 29.333,13.277 29.756,13.277 31.311,11.721 31.311,9.39 v1(30.311,8.39)
PERST#: P1.18 R8.2 U7.14 U8.14 U9.8 | length 64.8
  TopLayer w0.2: U7.14@15.925,48.392 15.925,47.643 15.942,47.626 16.835,47.626 v2(16.854,47.606) ; v2(20.022,22.676) 20.326,22.979 U8.14@21.46,22.979
  Bottom Layer w0.2: v2(16.854,47.606) 16.854,43.697 18.849,41.702 18.849,34.785 19.603,34.031 19.603,26.95 19.227,26.574 19.227,23.472 v2(20.022,22.676) 19.27,21.923 19.27,14.699 20.133,13.836 21.027,13.836 ; U9.8@21.844,13.481 21.381,13.481 21.027,13.836 ; P1.18@33.2,1.4 33.112,1.488 33.112,4.056 29.499,7.668 29.499,8.61 30.266,9.376 30.266,10.037 29.957,10.346 29.194,10.346 29.071,10.468 29.071,13.21 28.346,13.935 27.966,13.935 26.607,13.935 25.787,14.756 22.41,14.756 21.49,13.836 21.027,13.836
PET2_N: P1.38
PET2_P: P1.36
PET3_N: P1.44
PET3_P: P1.42
PG_LMK_1V8: R105.1 U8.3 U15.9 | length 10.7
  TopLayer w0.2: v1(21.034,29.044) R105.1@21.034,29.741
  TopLayer w0.25: U15.9@23.945,32.304 23.949,32.301 23.949,30.744 v2(23.952,30.74) ; U8.3@24.96,27.779 v2(24.96,28.559)
  Layer 2 w0.25: v1@21.059,29.044 21.059,28.246 21.206,28.099 24.501,28.099 v2(24.96,28.559)
  Layer 3 w0.25: v2(23.952,30.74) 25.06,29.632 25.06,28.713 24.96,28.613 v2(24.96,28.559)
PG_LMK_3V3: R104.1 U8.28 U15.17 | length 17.5
  TopLayer w0.2: v2(23.898,37.874) 23.898,37.806 24.059,37.645 24.059,36.786 24.051,36.779 24.051,36.645 23.985,36.579 23.985,36.294 U15.17@23.945,36.254
  TopLayer w0.25: R104.1@22.91,39.018 23.483,39.018 23.86,38.641 23.86,37.912 v2(23.898,37.874) ; U8.28@27.16,26.879 27.193,26.912 28.235,26.912 v2(28.264,26.941)
  Layer 2 w0.25: v2(23.898,37.874) 23.898,37.711 25.096,36.513 25.096,32.009 27.275,29.83 27.275,29.534 28.264,28.545 v2(28.264,26.941)
PG_LTC2122: R97.1 U8.20 U14.5 | length 18.1
  TopLayer w0.25: v2(20.923,14.653) 20.977,14.653 21.098,14.533 21.398,14.533 U14.5@21.398,14.492 ; v2(25.61,19.594) U8.20@25.61,22.079
  TopLayer w0.3: R97.1@19.993,20.291 20.047,20.237 21.201,20.237 v2(21.205,20.233)
  Layer 2 w0.25: v2(20.923,14.653) 20.96,14.69 21.093,14.69 21.576,15.174 23.613,15.174 24.481,16.042 24.481,18.465 v2(25.61,19.594)
  Layer 3 w0.3: v2(20.923,14.653) 20.923,19.911 21.205,20.193 v2(21.205,20.233)
PGND: C1.1 C3.1 C153.1 D11.2 FB30.1 FB31.1 P1.1 P1.3 R108.2 R109.2 U4.7 | length 35
  TopLayer w0.2: v2(1.702,15.538) C1.1@2.55,15.538 C1.1@2.606,15.538
  TopLayer w0.25: v1(3.649,51.742) C3.1@3.649,52.842 ; C153.1@17.323,9.627 17.323,10.445 v1(17.414,10.536) ; v1(17.625,8.336) 17.686,8.336 17.927,8.094 U4.7@18.827,8.094
  TopLayer w0.3: v2(2.715,7.421) D11.2@2.715,8.325 ; P1.3@24.072,1.4 P1.3@24.086,1.414
  TopLayer w0.5: v1(23.18,4.823) v1@23.2,4.803
  TopLayer w0.6: v1(17.323,12.164) 17.326,12.167 FB31.1@18.325,12.167 ; v1(17.414,10.536) FB30.1@18.325,10.536 ; P1.1@23.2,1.4 v1@23.2,4.803 ; v1(23.764,5.361) 24,5.125 P1.3@24,1.4
  Layer 1 w1: 0.9,34.344 0.9,48.993 v1(3.649,51.742)
  Bottom Layer w0.25: v1(22.753,5.397) 22.749,5.401 22.749,6.29 22.744,6.294 22.749,6.299 22.749,7.28 R108.2@22.753,7.285
Q: R88.3 U8.27 U12.13 | length 56.1
  TopLayer w0.15: U8.27@27.16,26.229 28.738,26.229 28.984,26.475 28.984,27.084 v1(29,27.1)
  Layer 2 w0.15: v1(29,27.1) 29,36.701 35.07,42.771 35.07,48.393 36.184,49.507 40.287,49.507 45.4,54.621 45.4,63.637 v1(46.481,64.718) ; v1(47.662,66.724) 47.662,68.775 v1(47.931,69.044)
  Bottom Layer w0.15: v1(46.481,64.718) ccw(c46.481,65.043) 46.711,64.813 R88.3@47.729,65.831 47.729,66.563 ccw(c47.501,66.563) v1(47.662,66.724) ; U12.13@47.547,70.157 47.547,70.072 47.931,69.688 v1(47.931,69.044)
Q\: R83.1 R86.3 U12.12 U22.19 | length 32.7
  Layer 3 w0.15: v1(32.8,76.1) 33.5,76.1 39.526,70.074 46.662,70.074 47.162,70.574 v1(49.8,70.574)
  Bottom Layer w0.15: U22.19@26.089,71.149 25.957,71.149 25.395,71.711 25.395,73.589 27.906,76.1 v1(32.8,76.1) ; U12.12@48.097,70.707 49.573,70.707 49.705,70.574 v1(49.8,70.574)
ResetN_1V8: U5.15 U23.11 | length 50.9
  TopLayer w0.15: U23.11@35.277,19.164 35.277,20.233 35.365,20.321 39.144,20.321 39.231,20.409 39.231,20.617 v2(41.3,22.685)
  Layer 2 w0.25: v2(41.3,22.685) 44.397,22.685 46.406,24.694 46.406,29.902 49.177,32.673 52.544,32.673 54.915,30.302 61.996,30.302 v2(62.586,30.892)
  Layer 3 w0.2: v2(62.586,30.892) 64.587,30.892 64.704,30.775 v2(64.704,23.506)
  Bottom Layer w0.2: U5.15@61.593,22.456 62.732,22.456 63.182,22.906 64.104,22.906 v2(64.704,23.506)
ResetN_3V3: U8.25 U23.2 | length 12.8
  TopLayer w0.15: v2(35.07,18.392) 35.07,18.339 35.277,18.132 U23.2@35.277,17.564
  TopLayer w0.25: U8.25@27.16,24.929 v1@28,24.93
  Layer 2 w0.15: v1(28,24.93) 28,24.26 28.264,23.996 29.182,23.996 31.267,21.91 31.267,21.124 31.908,20.484 33.725,20.484 35.07,19.139 v2(35.07,18.392)
RST_RF_P_1: U7.25 U12.15 | length 42.1
  TopLayer w0.2: U7.25@13.967,54.127 13.967,55.63 14.205,55.869 v1(14.205,55.943)
  Layer 3 w0.15: v1(14.205,55.943) 14.205,57.766 19.314,62.875 31.375,62.875 35.1,66.6 42.613,66.6 44.962,68.949 v1(46.705,68.949)
  Bottom Layer w0.15: U12.15@46.547,70.157 46.547,69.201 46.705,69.044 v1(46.705,68.949)
SCK: R11.2 U7.8 U8.8 U9.6 | length 50.2
  TopLayer w0.2: U7.8@12.017,48.427 12.017,46.402 14.9,43.519 v2(14.9,42.25) ; v2(18.446,30.109) 18.446,29.684 20.209,27.921 20.209,27.306 20.635,26.879 U8.8@21.46,26.879
  Bottom Layer w0.15: R11.2@18.257,19.039 17.479,18.261 17.479,14.234 19.342,12.371 20.865,12.371 21.276,12.781 U9.6@21.844,12.781
  Bottom Layer w0.2: R11.2@18.257,19.089 17.44,19.089 17.323,19.206 17.323,22.693 18.446,23.816 18.446,38.374
  Bottom Layer w0.25: v2(14.9,42.25) 17.44,42.25 18.446,41.244 18.446,38.374
SDA: R10.2 U7.9 U8.9 U9.5 | length 52.3
  TopLayer w0.2: U7.9@12.667,48.427 12.663,48.424 12.663,47.199 12.659,47.195 15.966,43.888 15.966,42.672 v2(17.061,41.577) ; v2(17.861,29.531) 19.357,28.035 19.357,27.592 20.72,26.229 U8.9@21.46,26.229
  Bottom Layer w0.15: R10.2@16.711,19.089 R10.2@16.711,19.039 15.861,18.189 15.861,15.428 19.218,12.071 21.018,12.071 21.379,12.431 U9.5@21.844,12.431
  Bottom Layer w0.2: R10.2@16.711,19.089 15.762,19.089 14.602,20.249 14.602,28.458 15.675,29.531 v2(17.861,29.531) 17.861,40.777 v2(17.061,41.577)
SMCLK: P1.15 R71.1 | length 9.1
  TopLayer w0.2: P1.15@28.8,1.4 29,1.6 29,2.552 30.021,3.573 v2(30.021,4.904) ; R71.1@31.025,9.554 31.072,9.507 v3(31.072,7.738)
  Layer 2 w0.2: v2(30.021,4.904) 31.072,5.955 v3(31.072,7.738)
SMDAT: P1.13 R70.1 | length 11
  TopLayer w0.2: P1.13@28,1.4 28,3.801 28.779,4.581 v2(29.279,4.581) ; v3(31.98,7.771) 31.98,9.532 31.977,9.536 R70.1@31.982,9.541
  Layer 2 w0.2: v2(29.279,4.581) 29.541,4.319 30.263,4.319 31.98,6.036 v3(31.98,7.771)
SPI_1V8_ADC: C15.1 C75.2 FB6.1 FB7.1 R14.2 R15.2 R98.2 U11.13 U14.10 U14.11 U14.12 U14.13 U14.14 | length 22.8
  TopLayer w0.25: v1(31.807,12.846) 32.652,12.001 33.023,12.001 33.327,11.697 33.327,11.321 C15.1@33.327,11.319
  TopLayer w0.3: C15.1@33.327,11.321 34.206,11.321 34.309,11.218 U11.13@35.461,11.218
  TopLayer w0.5: 25.132,17.798 27.181,17.798 C75.2@27.203,17.821 ; R15.2@29.831,30.789 29.831,29.9 29.899,29.832 R14.2@29.899,28.832 29.899,27.3 31.008,26.191 31.008,24.002
  Layer 3 w0.3: v3@29.5,20.808 29.5,20.364 30.516,19.348 30.516,14.539 31.807,13.247 v1(31.807,12.846)
  other v3: 29.499,20.777
SPI_1V8_CLK: C71.1 C113.2 C114.2 C117.2 C118.2 C121.2 C122.2 C125.2 C126.2 C131.2 C132.2 C135.2 C136.2 C141.2 C142.2 C143.2 C144.2 C147.2 C148.2 FB13.1 FB14.1 FB16.1 FB17.1 FB18.1 FB19.1 FB20.1 FB21.1 R12.2 R102.2 U10.13 U15.11 U15.12 U23.13 | length 58.8
  TopLayer w0.25: C142.2@25.601,31.431 25.601,31.591 ; 25.606,31.596 25.601,31.591 ; R102.2@25.654,30.567 25.654,31.386 25.664,31.396 25.664,31.406 C142.2@25.689,31.431 ; 25.942,32.352 25.601,32.011 25.601,31.591 ; v2(33.732,19.594) 33.77,19.556 33.77,19.296 34.102,18.964 U23.13@34.277,18.964 ; C71.1@40.84,12.264 41.23,12.264 ; C125.2@49.053,17.77 49.053,18.543 49.227,18.718 C126.2@49.479,18.718 ; C118.2@49.099,15.316 49.109,15.316 49.485,14.94 v1(49.485,14.921) ; C125.2@49.14,17.796 49.915,17.796 FB17.1@50.197,17.514 ; C117.2@49.387,14.414 49.387,14.733 49.495,14.841 v1@49.495,14.93 ; C148.2@56.944,10.769 57.453,10.769 C147.2@57.909,11.225 ; FB13.1@59.671,11.565 59.748,11.488 C113.2@60.93,11.488 ; FB13.1@59.799,11.479 60.037,11.24 C114.2@60.037,10.557 ; FB20.1@65.379,15.088 65.579,15.288 65.639,15.348 C143.2@66.464,15.348 ; C121.2@65.739,21.367 C121.2@65.849,21.257 ; C121.2@65.823,21.275 65.955,21.143 65.955,20.777 ; 66.033,14.384 66.048,14.369 C144.2@66.048,13.932 ; C122.2@66.24,20.269 66.265,20.294 66.265,20.729 v1(66.313,20.777)
  TopLayer w0.3: FB20.1@65.379,15.038 66.033,14.384 ; FB18.1@65.571,17.717 C132.2@66.373,17.717 66.009,17.354 C131.2@66.009,16.751 66.009,16.271 65.579,15.841 FB20.1@65.579,15.288
  TopLayer w0.5: C141.2@26.764,31.089 C141.2@26.788,31.065 ; C136.2@49.504,21.323 48.565,21.323 v2(48.532,21.289) 48.532,20.85 49.082,20.299 49.438,20.299 49.478,20.259 49.95,20.259 50.15,20.059 FB19.1@50.15,20.009 ; FB14.1@50.197,15.657 50.161,15.693 v1(50.161,16.586) 50.161,17.478 FB17.1@50.197,17.514 ; FB21.1@56.684,11.817 56.734,11.817 57.453,11.098 57.453,10.769 57.768,10.454 v1(58.507,10.454) 58.539,10.454 59.328,11.244 59.328,11.273 59.621,11.565 FB13.1@59.671,11.565 ; FB18.1@65.571,17.717 65.524,17.764 65.474,17.764 65.274,17.964 FB18.1@65.274,18.014 65.156,18.132 FB16.1@65.156,19.928 65.156,19.978 65.356,20.178 65.794,20.178 65.955,20.34 65.955,20.777 ; v1(66.313,20.777) 66.612,21.076 v1(66.841,21.076)
  Layer 3 w0.5: v2(33.732,19.594) 34.063,19.925 35.136,19.925 35.249,20.039 45.098,20.039 45.931,19.206 ; v3(39.717,12.222) 40.425,12.222 42.754,14.55 45.61,14.55 45.615,14.545
  Bottom Layer w0.25: R12.2@43.647,14.39 R12.2@43.658,14.379
  Bottom Layer w0.5: R12.2@43.658,14.429 45.718,16.489 50.064,16.489 v1(50.161,16.586)
  other v1: 25.883,32.673 26.764,32.673 26.764,33.382
  other v3: 26.755,31.979
SPI_CLK_LMK: U5.13 U10.12 | length 45.9
  TopLayer w0.2: U10.12@41.695,11.379 41.695,16.361 42.139,16.805 v3(42.176,16.805)
  Layer 2 w0.2: v3(42.176,16.805) 42.691,16.29 43.401,16.29 44.068,16.957 44.068,18.145 44.979,19.055 45.05,19.126 ccw(c44.908,19.267) 45.05,19.409 44.925,19.533 cw(c45.053,19.662) 44.925,19.79 44.989,19.854 cw(c45.118,19.726) 45.246,19.854 45.778,19.323 ccw(c45.906,19.451) 46.035,19.323 46.099,19.387 ccw(c45.97,19.515) 46.099,19.644 45.567,20.175 cw(c45.695,20.304) 45.567,20.432 45.631,20.496 cw(c45.76,20.368) 45.888,20.496 46.42,19.965 ccw(c46.548,20.093) 46.677,19.965 46.741,20.029 ccw(c46.613,20.157) 46.741,20.286 46.246,20.781 cw(c46.374,20.909) 46.246,21.038 46.31,21.102 cw(c46.438,20.973) 46.567,21.102 46.655,21.014 ccw(c46.796,21.155) 46.937,21.014 47.526,21.602 48.88,22.957 48.88,27.319 50.856,29.295 53.291,29.295 53.766,28.82 60.107,28.82 61.069,27.858 61.069,26.53 62.775,24.824 v3(62.775,24.103)
  Bottom Layer w0.2: U5.13@60.443,23.106 60.463,23.126 60.463,23.47 61.095,24.103 v3(62.775,24.103)
SPI_CLK_LTC: U6.45 U11.12 | length 28.2
  TopLayer w0.15: v3(32.721,12.863) 32.721,12.856 33.832,11.745 34.498,11.745 34.65,11.593 35.616,11.593 35.668,11.542 36.1,11.542 U11.12@36.1,11.379
  Layer 3 w0.2: v2(30.7,29.792) 30.7,29.532 30.361,29.192 30.361,27.779 cw(c30.161,27.779) 30.161,27.579 29.847,27.579 ccw(c29.847,27.438) 29.706,27.438 29.706,27.367 ccw(c29.847,27.367) 29.847,27.226 30.161,27.226 cw(c30.161,27.026) 30.361,27.026 30.361,26.926 30.361,20.435 30.918,19.878 30.918,15.687 32.721,13.883 v3(32.721,12.863)
  Bottom Layer w0.2: v2(30.7,29.792) 31.028,29.792 31.733,30.497 32.416,30.497 32.971,29.942 U6.45@35.217,29.942
SPI_CLK_MB: P1.45 U10.1 U11.1 | length 18.2
  TopLayer w0.15: U11.1@36.1,9.829 36.1,7.562 36.417,7.244 36.906,7.244 37.042,7.108 41.126,7.108 41.441,7.423 41.801,7.423 v3(42.176,7.798)
  TopLayer w0.2: U10.1@41.695,9.829 41.695,8.336 42.176,7.855 v3(42.176,7.798) ; v2(43.797,4.566) 43.822,4.54 43.822,2.898 44,2.721 P1.45@44,1.4
  Layer 2 w0.2: v3(42.176,7.798) 42.176,6.974 43.797,5.353 v2(43.797,4.566)
SPI_CS_LMK: R12.1 U5.12 U10.9 | length 44
  TopLayer w0.2: U10.9@42.895,11.379 42.895,12.334 v2(43.251,12.69)
  Layer 2 w0.25: v2(43.251,12.69) 45.204,12.69 45.739,13.225 45.827,13.313 ccw(c45.642,13.499) 45.827,13.684 45.445,14.067 cw(c45.631,14.252) 45.445,14.438 45.538,14.531 cw(c45.724,14.345) 45.909,14.531 47.188,13.252 ccw(c47.373,13.438) 47.559,13.252 47.652,13.345 ccw(c47.466,13.531) 47.652,13.717 46.373,14.995 cw(c46.559,15.181) 46.373,15.366 46.466,15.459 cw(c46.652,15.273) 46.838,15.459 48.116,14.181 ccw(c48.302,14.366) 48.487,14.181 48.58,14.274 ccw(c48.394,14.459) 48.58,14.645 47.342,15.883 cw(c47.527,16.069) 47.342,16.254 47.435,16.347 cw(c47.62,16.162) 47.806,16.347 48.148,16.005 ccw(c48.334,16.191) 48.519,16.005 48.88,16.366 48.88,19.148 v2(52.759,23.027)
  Layer 3 w0.2: v2(52.759,23.027) 53.079,22.708 59.892,22.708 62.077,24.892 v3(63.475,24.892)
  Bottom Layer w0.2: U5.12@59.943,23.106 59.963,23.126 59.963,23.536 61.318,24.892 v3(63.475,24.892)
  Bottom Layer w0.25: v2(43.251,12.69) 43.658,13.097 R12.1@43.658,13.429
SPI_CS_LTC: R15.1 U6.46 U11.9 | length 27.7
  TopLayer w0.15: v3(35.517,12.846) 36.339,12.846 37.3,11.885 U11.9@37.3,11.379
  TopLayer w0.2: R15.1@30.831,30.789 30.833,30.787 31.321,30.787
  TopLayer w0.25: 31.321,30.787 v2(31.623,31.089)
  Layer 3 w0.2: v2(31.623,31.089) 31.824,31.089 32.824,30.089 32.824,28.563 32.502,28.241 32.502,18.669 35.517,15.654 v3(35.517,12.846)
  Bottom Layer w0.2: v2(31.623,31.089) 32.239,31.089 32.481,30.847 34.143,30.847 34.537,30.452 35.208,30.452 U6.46@35.217,30.442
SPI_MISO_LMK: R16.2 U10.10 | length 3.7
  TopLayer w0.15: U10.10@42.495,11.379 42.495,13.371 42.815,13.69 R16.2@44.096,13.69